# Altium PCB Aquarium_ATO_V1_0_LCEDA.PcbDoc
Units mm, origin at the board's own origin, x right, y up, seen from the top; angles counter-clockwise.
Board outline 120 x 72 mm, 2 copper layers (Top Layer, Bottom Layer), stack 1.58 mm thick; 64 components, 41 nets, 182 pads, 109 vias.
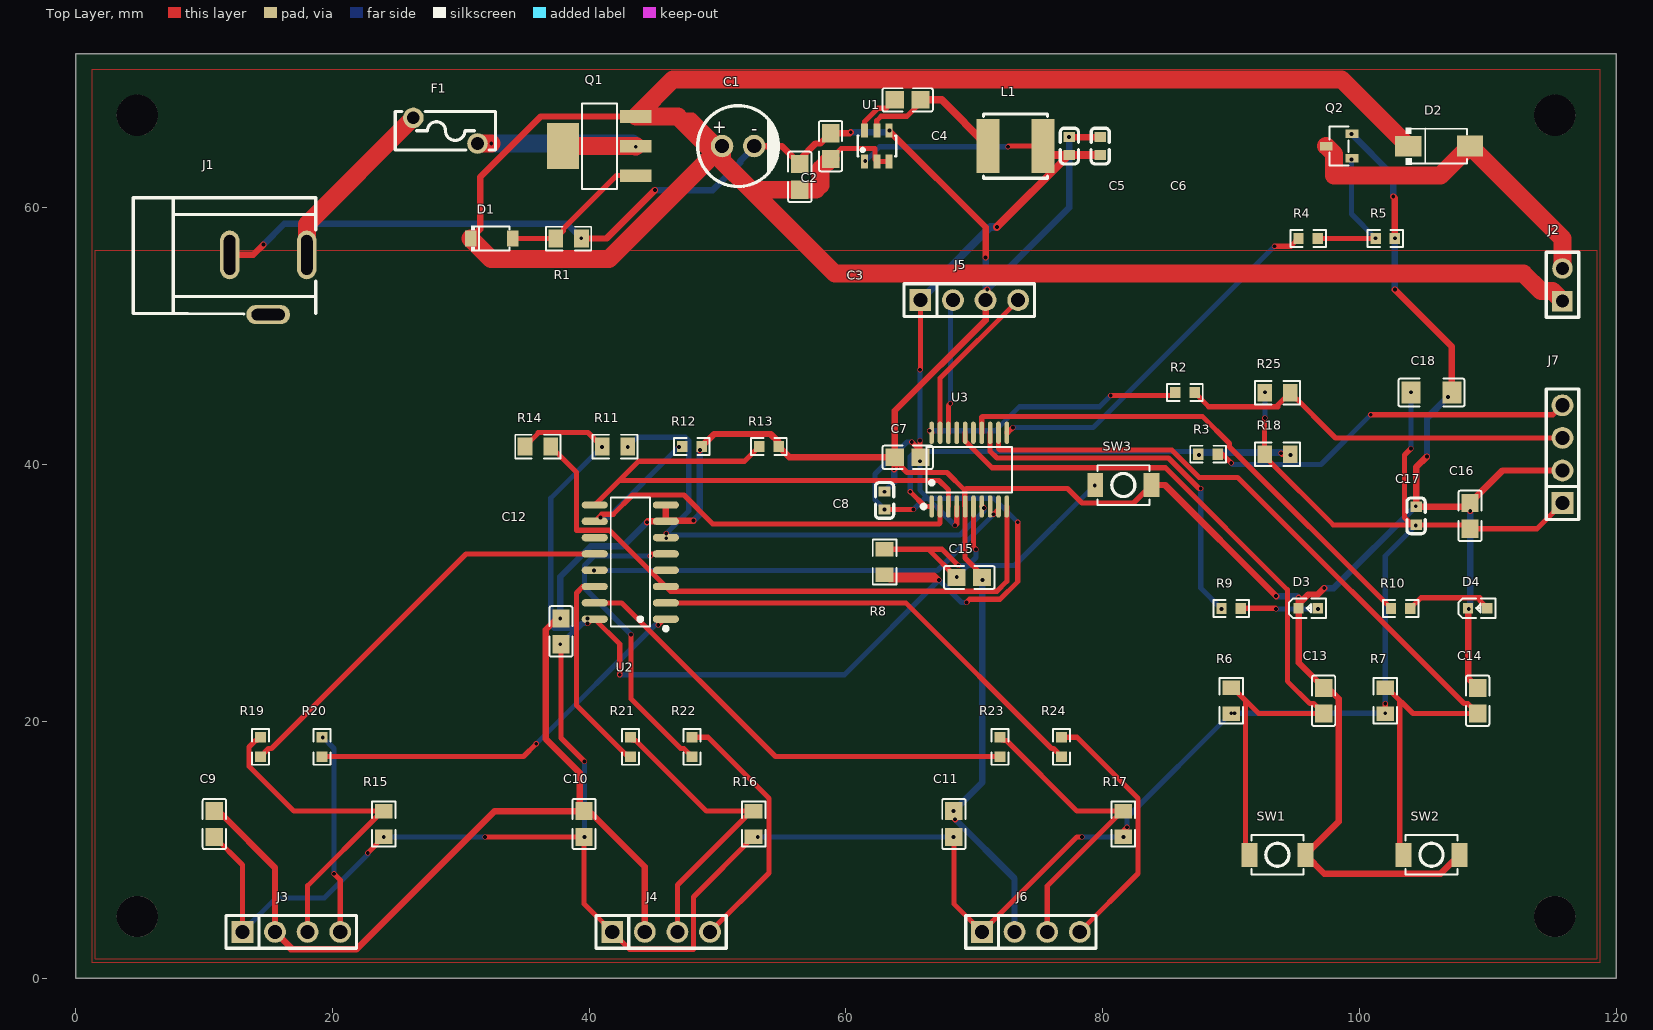
[diagram p0: Top Layer view]
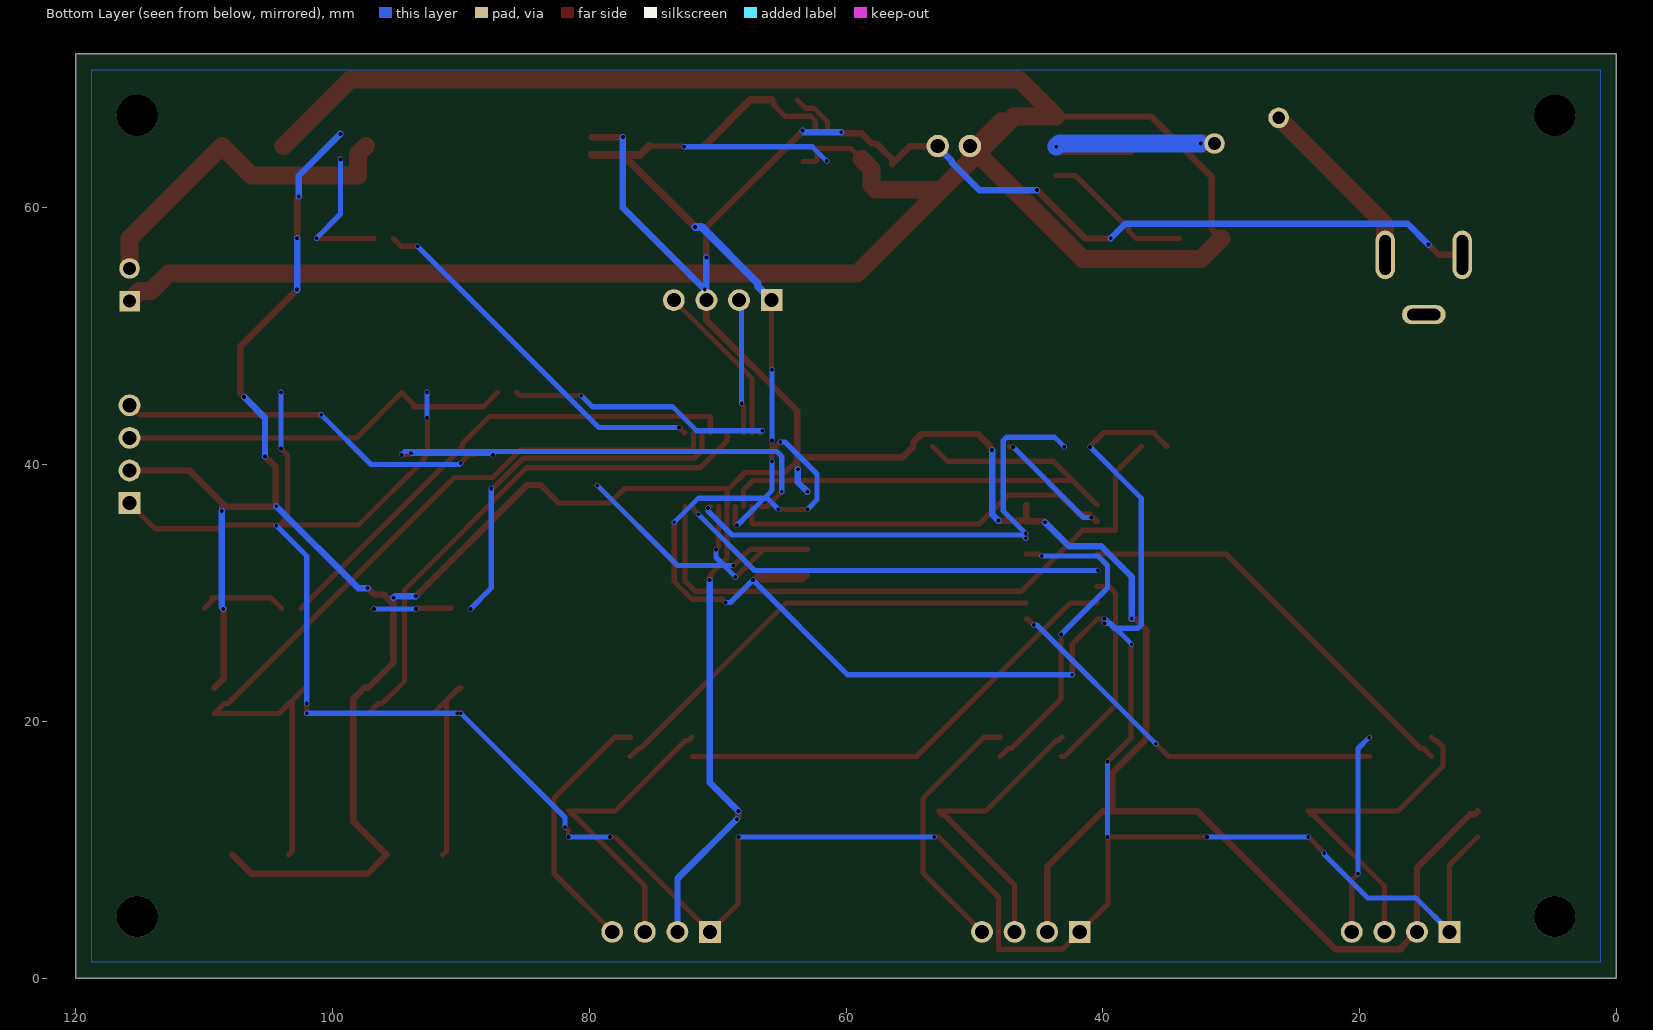
[diagram p1: Bottom Layer view, seen from below]

## Layer stack, top to bottom
Top Solder Mask Layer: solder mask 0.0102, Dk 3.3
Top Layer: signal copper 0.0356
Dielectric1: surface 1.5088, FR4, Dk 4.5
Bottom Layer: signal copper 0.0356
Bottom Solder Mask Layer: solder mask 0.0102, Dk 3.3

## Board outline
0,0 120,0 120,72 0,72

## Components (designator, comment, footprint, x,y, rotation, side; value= is the part's Value field where it differs from the comment)
C1 "47uF" CAP-TH_BD6.3-P2.50-D0.6-FD 51.6,64.8 r0 top
C2 "10uF" C0805#1 56.4,62.4 r90 top
C3 "100nF" C0805#1 58.8,64.8 r90 top
C4 "100nF" C0805#2 64.8,68.4 r0 top
C5 "22uF" C0603#1 77.4,64.8 r90 top
C6 "22uF" C0603#1 79.8,64.8 r90 top
C7 "100nF" C0805#2 64.8,40.56 r180 top
C8 "4.7uF" C0603#2 63,37.2 r90 top
C9 "100nF" C0805#2 10.8,12 r90 top
C10 "100nF" C0805#3 39.6,12 r90 top
C11 "100nF" C0805#2 68.4,12 r90 top
C12 "100nF" C0805#2 37.8,27 r90 top
C13 "100nF" C0805#2 97.2,21.6 r90 top
C14 "100nF" C0805#2 109.2,21.6 r90 top
C15 "100nF" C0805#3 69.6,31.2 r0 top
C16 "100nF" C0805#2 108.6,36 r90 top
C17 "10uF" C0603#2 104.4,36 r90 top
C18 "220uF" C1206 105.6,45.6 r0 top
D1 "BZT52C10" SOD-123_L2.7-W1.6-LS3.7-RD 32.4,57.6 r0 top
D2 "SS16" SMA_L4.3-W2.6-LS5.0-RD 106.2,64.8 r0 top
D3 "FC-1608G1-520" LED0603-RD 96,28.8 r0 top
D4 "XL-1608SURC-06" LED0603-RD_RED 109.2,28.8 r0 top
F1 "RL60-050" FUSE-TH_L7.8-W3.0-P5.10-D0.5-S2.00 28.8,66 r0 top
J1 "DC005-T25" DC-IN-TH_DC-005-20A-1 15,54 r0 top
J2 "LAIL-PZ2.54-2P-L" CONN-TH_LAIL-PZ2.54-2P-L 115.8,54 r90 top
J3 "HX PZ2.54-1x4P ZZ" HDR-TH_4P-P2.54-V-M 16.8,3.6 r0 top
J4 "HX PZ2.54-1x4P ZZ" HDR-TH_4P-P2.54-V-M 45.6,3.6 r0 top
J5 "HX PZ2.54-1x4P ZZ" HDR-TH_4P-P2.54-V-M 69.6,52.8 r0 top
J6 "HX PZ2.54-1x4P ZZ" HDR-TH_4P-P2.54-V-M 74.4,3.6 r0 top
J7 "HX PZ2.54-1x4P ZZ" HDR-TH_4P-P2.54-V-M 115.8,40.8 r90 top
L1 "3.9uH" IND-SMD_L5.0-W5.0_FNR50XXS 73.2,64.8 r0 top
Q1 "DMP6023LE-13" SOT-223-4_L6.5-W3.5-P2.30-LS7.0-BR 40.8,64.8 r0 top
Q2 "AO3400A" SOT-23-3_L2.9-W1.3-P1.90-LS2.4-BR 98.4,64.8 r0 top
R1 "47kΩ" R0805 38.4,57.6 r0 top
R2 "1kΩ" R0603#1 86.4,45.6 r0 top
R3 "1kΩ" R0603#2 88.2,40.8 r0 top
R4 "1kΩ" R0603#1 96,57.6 r0 top
R5 "100kΩ" R0603#2 102,57.6 r0 top
R6 "10kΩ" R0805 90,21.6 r90 top
R7 "10kΩ" R0805 102,21.6 r90 top
R8 "10kΩ" R0805 63,32.4 r90 top
R9 "1kΩ" R0603#2 90,28.8 r0 top
R10 "1kΩ" R0603#1 103.2,28.8 r0 top
R11 "10kΩ" R0805 42,41.4 r0 top
R12 "100kΩ" R0603#2 48,41.4 r0 top
R13 "100kΩ" R0603#1 54,41.4 r0 top
R14 "10kΩ" R0805 36,41.4 r0 top
R15 "10kΩ" R0805 24,12 r90 top
R16 "10kΩ" R0805 52.8,12 r90 top
R17 "10kΩ" R0805 81.6,12 r90 top
R18 "10kΩ" R0805 93.6,40.8 r0 top
R19 "1kΩ" R0603#1 14.4,18 r90 top
R20 "1kΩ" R0603#3 19.2,18 r90 top
R21 "1kΩ" R0603#1 43.2,18 r90 top
R22 "1kΩ" R0603#1 48,18 r90 top
R23 "1kΩ" R0603#3 72,18 r90 top
R24 "1kΩ" R0603#1 76.8,18 r90 top
R25 "10kΩ" R0805 93.6,45.6 r0 top
SW1 "TS-1088-AR02016" SW-SMD_L3.9-W3.0-P4.45 93.6,9.6 r0 top
SW2 "TS-1088-AR02016" SW-SMD_L3.9-W3.0-P4.45 105.6,9.6 r0 top
SW3 "TS-1088-AR02016" SW-SMD_L3.9-W3.0-P4.45 81.6,38.4 r0 top
U1 "AP63203WU-7" TSOT-26_L2.9-W1.6-P0.95-LS2.8-BL 62.4,64.8 r0 top
U2 "74HC4052D,652" SO-16_L9.9-W3.9-P1.27-LS6.0-BL 43.2,32.4 r90 top
U3 "STM32G030F6P6" TSSOP-20_L6.5-W4.4-P0.65-LS6.4-BL 69.6,39.6 r0 top

## Footprints (in the part's own frame and the unit in brackets; to place one, negate y for a bottom-side part, rotate by r counter-clockwise, add the part's x,y. Pads: shape width x height; smd on the part's side, far side on the other; paste and mask are expansions set on the pad)
C0603#1 [mil]
  rect 31.5x35.4 smd: 1(-27.6,0) 2(27.6,0)
  silkscreen extent -55,-28 55,28
C0603#2 [mil]
  rect 31.5x35.4 smd: 1(-27.5,0) 2(27.6,0)
  silkscreen extent -55,-28 55,28
C0805#1 [mil]
  rect 55.5x53.1 smd paste-3937 mask+2: 1(-39.4,0) 2(39.3,0)
  silkscreen extent -77,-36 77,36
C0805#2 [mil]
  rect 55.5x53.1 smd paste-3937 mask+2: 1(-39.4,0) 2(39.4,0)
  silkscreen extent -77,-36 77,36
C0805#3 [mil]
  rect 55.5x53.1 smd paste-3937 mask+2: 1(-39.3,0) 2(39.4,0)
  silkscreen extent -77,-36 77,36
C1206 [mil]
  rect 58.5x68 smd paste-3937 mask+2: 1(-62.7,0) 2(62.7,0)
  silkscreen extent -101,-43 101,43
CAP-TH_BD6.3-P2.50-D0.6-FD [mm]
  round 1.75 hole 1.1 paste+0 mask+0.051: 1(-1.25,0) 2(1.25,0)
  silkscreen extent -3.15,-3.15 3.21,3.15
CONN-TH_LAIL-PZ2.54-2P-L [mil]
  rect 63x63 hole 39.4 paste+0 mask+2: 1(-50,0)
  round 63 hole 39.4 paste+0 mask+2: 2(50,0)
  silkscreen extent -100,-50 100,50
DC-IN-TH_DC-005-20A-1 [mil]
  oval 59.1x149.6 hole 35.4 slot 122.1 at 90 deg: 1(118.2,91.5) 2(-118.1,91.5)
  oval 133.9x59.1 hole 35.4 slot 102.4 at 0 deg: 3(0,-91.5)
  silkscreen extent -414,-90 146,267
FUSE-TH_L7.8-W3.0-P5.10-D0.5-S2.00 [mil]
  round 63 hole 39.4: 1(-98.4,39.4) 2(98.4,-39.4)
  silkscreen extent -154,-59 154,59
HDR-TH_4P-P2.54-V-M [mm]
  rect 1.699x1.699 hole 1.1: 1(-3.81,0)
  round 1.699 hole 1.1: 2(-1.27,0) 3(1.27,0) 4(3.81,0)
  silkscreen extent -5.08,-1.27 5.08,1.27
IND-SMD_L5.0-W5.0_FNR50XXS [mm]
  rect 1.801x4.201 smd: 1(-2.149,0) 2(2.149,0)
  silkscreen extent -2.5,-2.5 2.5,2.5
LED0603-RD [mil]
  rect 31.5x31.5 smd: 1(-29.5,0) 2(29.5,0)
  silkscreen extent -59,-29 55,30
LED0603-RD_RED [mil]
  rect 31.5x31.5 smd: 1(-29.5,-0.1) 2(29.5,0.2)
  silkscreen extent -59,-29 55,30
R0603#1 [mil]
  rect 31.8x34 smd paste-3937 mask+2: 1(-29.7,0) 2(29.7,0)
  silkscreen extent -54,-26 54,26
R0603#2 [mil]
  rect 31.8x34 smd paste-3937 mask+2: 1(-29.7,0) 2(29.6,0)
  silkscreen extent -55,-26 54,26
R0603#3 [mil]
  rect 31.8x34 smd paste-3937 mask+2: 1(-29.6,0) 2(29.7,0)
  silkscreen extent -54,-26 54,26
R0805 [mm]
  rect 1.133x1.377 smd paste-100 mask+0.051: 1(-1.001,0) 2(1.001,0)
  silkscreen extent -1.76,-0.92 1.76,0.92
SMA_L4.3-W2.6-LS5.0-RD [mm]
  rect 2.047x1.621 smd: 1(-2.403,-0.01) 2(2.403,0.01)
  silkscreen extent -2.61,-1.44 2.16,1.44
SO-16_L9.9-W3.9-P1.27-LS6.0-BL [mil]
  oval 22.6x80.2 smd: 1(-175,-109) 2(-125,-109) 3(-75,-109) 4(-25,-109) 5(25,-109) 6(75,-109) 7(125,-109) 8(175,-109) 9(175,109) 10(125,109) 11(75,109) 12(25,109) 13(-25,109) 14(-75,109) 15(-125,109) 16(-175,109)
  silkscreen extent -210,-115 198,60
SOD-123_L2.7-W1.6-LS3.7-RD [mil]
  rect 35.8x48 smd: 1(-64.4,0) 2(64.4,0)
  silkscreen extent -63,-40 54,40
SOT-23-3_L2.9-W1.3-P1.90-LS2.4-BR [mm]
  rect 1.001x0.65 smd: 1(1.001,-0.95) 2(1.001,0.95) 3(-1.001,0)
  silkscreen extent -0.73,-1.53 0.73,1.53
SOT-223-4_L6.5-W3.5-P2.30-LS7.0-BR [mm]
  rect 2.469x0.98 smd: 1(2.835,-2.301) 2(2.835,0) 3(2.835,2.301)
  rect 2.469x3.599 smd: 4(-2.835,0)
  silkscreen extent -1.37,-3.33 1.37,3.33
SW-SMD_L3.9-W3.0-P4.45 [mil]
  rect 48.4x73.2 smd: 1(-86,0) 2(86,0)
  silkscreen extent -80,-61 80,61
TSOT-26_L2.9-W1.6-P0.95-LS2.8-BL [mm]
  rect 0.551x1.1 smd paste+0 mask+0.051: 1(-0.95,-1.199) 2(0,-1.199) 3(0.95,-1.199) 4(0.95,1.199) 5(0,1.199) 6(-0.95,1.199)
  silkscreen extent -1.5,-0.8 1.5,0.8
TSSOP-20_L6.5-W4.4-P0.65-LS6.4-BL [mil]
  oval 14.3x68.6 smd: 1(-115.2,-113) 2(-89.6,-113) 3(-64,-113) 4(-38.4,-113) 5(-12.8,-113) 6(12.8,-113) 7(38.4,-113) 8(64,-113) 9(89.6,-113) 10(115.2,-113) 11(115.2,113) 12(89.6,113) 13(64,113) 14(38.4,113) 15(12.8,113) 16(-12.8,113) 17(-38.4,113) 18(-64,113) 19(-89.6,113) 20(-115.2,113)
  silkscreen extent -146,-119 131,70

## Free pads (board coordinates)
  round 3.2 hole 3.2 unplated paste+0 mask+0: MH1(4.8,67.2) MH2(115.2,67.2) MH3(4.8,4.8) MH4(115.2,4.8)

## Via types
v1: diameter 0, hole 0.3, Top Layer to Bottom Layer, 109 vias

## Nets (pads, with @x,y where several pads share a name; then routed paths per layer and width w, separated by ;. In a path a pad name is that pad's centre, name@x,y a point inside that pad or via, vN(x,y) a via of type N, cw(c..) or ccw(c..) an arc to the next point about the centre after c; other vN are vias at no path point)
+3V3: C5.1 C6.1 C7.1 C8.1 C9.1 C10.1 C11.1 C12.1 C16.1 C17.1 C18.1 J3.1 J4.1 J5.1 J6.1 J7.1 L1.2 R6.1 R7.1 R8.1 R11.1 R14.1 R15.1 R16.1 R17.1 R18.1 R25.1 U1.1 U2.16 U3.4 | length 361
  Top Layer w0.4: C9.1 12.99,8.809 J3.1 v1(13,3.625) ; v1(22.75,9.75) R15.1 ; v1(31.875,11) C10.1 ; R14.1 36,42.401 36,42.5 39.899,42.5 R11.1 v1(41,41.375) ; v1(37.75,26) C12.1 37.8,18.7 v1(39.625,16.875) ; v1(39.625,11) C10.1 ; v1(39.875,27.625) 40.205,27.955 U2.16 ; v1(39.875,28) 39.92,27.955 U2.16 ; v1(42.375,23.625) 42.375,26.011 U2.16 ; v1(53.125,11) R16.1 48.125,6.324 48.125,2.25 43.14,2.25 J4.1 39.6,5.79 C10.1 ; U1.1 61.474,63.625 v1(61.5,63.625) ; v1(63,36.5) C8.1 v1(65.25,36.5) ; v1(65.125,41.75) 65.801,41.074 C7.1 ; v1(65.75,40.25) 65.801,40.301 C7.1 ; v1(65.75,41.875) 65.75,40.611 C7.1 ; v1(65.75,47.375) 65.79,47.415 J5.1 ; v1(68.375,11) C11.1 68.4,5.79 J6.1 77.99,11 v1(78.375,11) ; v1(68.5,35.25) 68.625,35.375 U3.4 ; v1(69.375,29.25) 69.625,29.5 72,29.5 73.375,30.875 v1(73.375,35.5) ; v1(72.625,64.75) 72.675,64.8 L1.2 ; v1(81.625,11) R17.1 81.6,11.475 v1(81.875,11.75) ; v1(90,20.625) R6.1 90.224,20.599 v1(90.25,20.625) ; R25.1 v1(92.625,45.625) ; v1(92.625,43.625) 92.599,43.599 R18.1 92.875,40.524 92.875,40.375 97.949,35.301 C17.1 ; v1(102,20.625) R7.1 v1(102,21.375) ; v1(104,41.25) 103.5,40.75 103.5,35.875 104.074,35.301 C17.1 ; v1(104,45.625) C18.1 ; v1(104.375,35.25) 104.375,35.276 C17.1 ; J7.1 113.809,34.999 C16.1 108.298,35.301 C17.1 ; R8.1 66.851,31.399 v1(67.25,31) 63.399,31 R8.1
  Top Layer w0.6: v1(65.75,52.75) J5.1 ; v1(71.75,58.5) 77.349,64.099 C5.1 ; L1.2 76.05,64.099 C5.1 ; C6.1 C5.1
  Bottom Layer w0.4: v1(13,3.625) 15.625,6.25 19.375,6.25 22.75,9.625 v1(22.75,9.75) ; v1(24,11) v1(31.875,11) ; v1(37.75,26) 39.375,27.625 v1(39.875,27.625) ; v1(39.625,11) v1(39.625,16.875) ; v1(39.875,28) 39.125,27.25 37.25,27.25 37,27.5 37,37.375 v1(41,41.375) ; v1(42.375,23.625) 59.875,23.625 v1(67.25,31) 69,29.25 v1(69.375,29.25) ; v1(53.125,11) v1(68.375,11) ; v1(61.5,63.625) 62.625,64.75 v1(72.625,64.75) ; v1(63,36.5) 62.25,37.25 62.25,39.25 64.75,41.75 v1(65.125,41.75) ; v1(65.25,36.5) 66.125,37.375 71.5,37.375 v1(73.375,35.5) ; v1(65.75,40.25) 65.75,38 v1(68.5,35.25) ; v1(65.75,41.875) v1(65.75,47.375) ; v1(78.375,11) v1(81.625,11) ; v1(81.875,11.75) 81.875,12.5 v1(90,20.625) ; v1(90.25,20.625) v1(102,20.625) ; v1(92.625,43.625) v1(92.625,45.625) ; v1(102,21.375) 102,32.875 v1(104.375,35.25) ; v1(104,41.25) v1(104,45.625)
  Bottom Layer w0.6: v1(65.75,52.75) 66.875,53.875 66.875,54.125 71.25,58.5 v1(71.75,58.5)
+12V_IN: F1.1 J1.1 | length 14.1
  Top Layer w1.4: J1.1 18.002,58.702 F1.1
AUX_RX: J4.3 R16.2 R21.2 | length 23.9
  Top Layer w0.4: R21.2 43.454,18.5 43.625,18.5 49.124,13.001 R16.2 52.549,12.75 52.375,12.75 46.87,7.245 J4.3
AUX_RX_MUX: R21.1 U2.14 | length 16.2
  Top Layer w0.4: U2.14 39.495,30.495 39,30 39,21.25 43,17.25 R21.1
AUX_TX: J4.4 R22.2 | length 20.3
  Top Layer w0.4: R22.2 49.246,18.754 54,14 54,8.19 J4.4
AUX_TX_MUX: R22.1 U2.5 | length 25.2
  Top Layer w0.4: v1(43.25,26.75) 43.25,21.75 47.125,17.875 47.371,17.875 R22.1 ; v1(44.75,32.875) 44.91,33.035 U2.5
  Bottom Layer w0.4: v1(43.25,26.75) 39.625,30.375 39.625,32.125 40.375,32.875 v1(44.75,32.875)
BST: C4.1 U1.6 | length 3.8
  Top Layer w0.4: U1.6 61.45,66.7 62.5,67.75 63.149,67.75 C4.1
D3_A: D3.2 R9.2 | length 6.1
  Top Layer w0.4: R9.2 93.45,28.8 v1(93.5,28.75) ; v1(96.75,28.75) D3.2
  Bottom Layer w0.4: v1(93.5,28.75) v1(96.75,28.75)
D4_A: D4.2 R10.2 | length 6.8
  Top Layer w0.4: R10.2 104.779,29.625 109.375,29.625 109.375,29.379 D4.2
GND: C1.2 C2.2 C3.2 C5.2 C6.2 C7.2 C8.2 C9.2 C10.2 C11.2 C12.2 C13.2 C14.2 C15.2 C16.2 C17.2 C18.2 D3.1 D4.1 J1.2 J3.2 J4.2 J5.3 J6.2 J7.2 Q2.2 R1.2 R5.2 R12.2 R13.2 SW1.2 SW2.2 SW3.2 U1.4 U2.7 U2.8 U3.5 | length 404.7
  Top Layer w0.4: C7.2 63.799,40.326 64.75,39.375 67.875,39.375 69.25,38 69.25,36.755 U3.5 ; C15.2 70.5,31.301 70.5,31.5 69.275,32.725 U3.5 ; SW3.2 82.384,37 78.375,37 77.25,38.125 69.375,38.125 69.275,38.025 U3.5
  Top Layer w0.5: C9.2 11.051,12.75 11.375,12.75 15.53,8.595 J3.2 16.75,2.38 16.75,2.25 21.875,2.25 32.626,13.001 C10.2 ; J1.2 13.824,56.324 v1(14.625,57.125) ; v1(37.75,28) C12.2 37.501,28.001 36.625,27.125 36.625,18.625 39.25,16 39.25,13.351 C10.2 ; v1(39.375,57.625) R1.2 41.35,57.6 v1(45.125,61.375) ; J4.2 44.33,8.67 39.999,13.001 C10.2 ; v1(44.5,35.5) 44.575,35.575 U2.7 ; U2.8 U2.7 ; v1(48.125,35.625) 46.019,35.625 U2.7 ; v1(48.625,41.125) 48.752,41.252 R12.2 49.727,42.375 54.125,42.375 54.754,41.746 R13.2 55.594,40.56 C7.2 ; v1(52.875,64.75) 52.875,64.775 C1.2 54.998,64.8 C2.2 56.4,63.775 57.625,65 58.002,65 C3.2 60.298,65.798 v1(60.375,65.875) ; v1(63,37.875) C8.2 ; v1(63.375,66) U1.4 70.875,58.474 v1(70.875,56.125) ; v1(63.75,39.625) 63.799,39.674 C7.2 ; v1(68.375,13) C11.2 68.4,12.475 v1(68.5,12.375) ; C15.2 70.601,31.024 v1(70.625,31) ; v1(70.875,52.75) J5.3 ; v1(71,53.625) 70.87,53.495 J5.3 ; v1(73.125,3.625) J6.2 ; v1(77.375,65.5) C5.2 C6.2 ; SW3.2 84.85,38.4 v1(93.5,29.75) ; v1(95.25,29.625) D3.1 ; v1(97.25,30.375) 96.75,29.875 96,29.875 95.251,29.126 D3.1 ; v1(99.375,65.75) Q2.2 ; v1(102.625,60.875) 102.752,60.748 R5.2 v1(102.75,57.625) ; v1(102.75,53.625) 107.193,49.182 C18.2 106.875,45.282 v1(106.875,45.25) ; v1(104.375,36.75) 104.375,36.726 C17.2 ; v1(105.25,40.625) 104.4,39.775 C17.2 ; SW2.2 106.309,8.125 97.259,8.125 SW1.2 98.375,12.191 98.375,21.75 97.524,22.601 C13.2 95.251,24.55 D3.1 ; v1(108.5,28.75) D4.1 108.451,23.35 C14.2 ; v1(108.625,36.375) 108.6,36.4 C16.2 ; J7.2 111.129,39.53 C16.2 ; C7.2 63.799,44.174 70.87,51.245 J5.3 ; C17.2 108.3,36.701 C16.2
  Bottom Layer w0.5: v1(14.625,57.125) 16.25,58.75 38.25,58.75 v1(39.375,57.625) ; v1(37.75,28) 37.75,31.25 40.125,33.625 42.625,33.625 v1(44.5,35.5) ; v1(45.125,61.375) 49.625,61.375 51.75,63.5 51.75,63.625 v1(52.875,64.75) ; v1(48.125,35.625) 48.625,36.125 v1(48.625,41.125) ; v1(60.375,65.875) 63.25,65.875 v1(63.375,66) ; v1(63,37.875) 63.75,38.625 v1(63.75,39.625) ; v1(68.375,13) 70.625,15.25 v1(70.625,31) ; v1(68.5,12.375) 73.125,7.75 v1(73.125,3.625) ; v1(70.875,52.75) v1(70.875,56.125) ; v1(71,53.625) 77.375,60 v1(77.375,65.5) ; v1(93.5,29.75) 95.125,29.75 v1(95.25,29.625) ; v1(97.25,30.375) 98,30.375 v1(104.375,36.75) ; v1(99.375,65.75) 102.625,62.5 v1(102.625,60.875) ; v1(102.75,53.625) v1(102.75,57.625) ; v1(105.25,40.625) 105.25,43.625 v1(106.875,45.25) ; v1(108.5,28.75) 108.625,28.875 v1(108.625,36.375)
KEY_AUTO: C13.1 R6.2 SW1.1 U3.16 | length 63.2
  Top Layer w0.4: U3.16 69.275,41.85 71.375,39.75 84.875,39.75 94.375,30.25 94.375,23.125 96.125,21.375 96.424,21.375 C13.1 92.151,20.599 90.25,22.5 90.101,22.5 R6.2 90.149,22.601 91.125,21.625 91.125,9.891 SW1.1
KEY_MANUAL: C14.1 R7.2 SW2.1 U3.12 | length 68.8
  Top Layer w0.4: U3.12 71.876,41.249 72,41.125 85.375,41.125 87.5,39 90.5,39 108.125,21.375 108.424,21.375 C14.1 104.151,20.599 102.25,22.5 102.101,22.5 R7.2 102.149,22.601 103.125,21.625 103.125,9.891 SW2.1
LED_FAULT: R10.1 U3.14 | length 39.5
  Top Layer w0.4: U3.14 70.575,43.7 70.625,43.75 87.75,43.75 89.875,41.625 89.875,41.371 R10.1
LED_STATUS: R9.1 U3.13 | length 29.1
  Top Layer w0.4: U3.13 71.226,41.024 71.75,40.5 85.125,40.5 87.5,38.125 v1(87.625,38.125) ; R9.1 v1(89.25,28.75)
  Bottom Layer w0.4: v1(87.625,38.125) 87.625,30.375 v1(89.25,28.75)
MAIN_RX: J3.3 R15.2 R19.2 | length 26.6
  Top Layer w0.4: R19.2 14.146,18.5 14,18.5 13.5,18 13.5,16.5 16.999,13.001 R15.2 23.749,12.75 23.625,12.75 18.07,7.195 J3.3
MAIN_RX_MUX: R19.1 U2.12 | length 32.6
  Top Layer w0.4: R19.1 15.029,17.875 15.25,17.875 30.41,33.035 U2.12
MAIN_TX: J3.4 R20.2 | length 15.8
  Top Layer w0.4: R20.2 v1(19.25,18.75) ; v1(20.125,8.125) 20.61,7.64 J3.4
  Bottom Layer w0.4: v1(19.25,18.75) 20.125,17.875 v1(20.125,8.125)
MAIN_TX_MUX: R20.1 U2.1 | length 31.2
  Top Layer w0.4: R20.1 34.873,17.248 v1(35.875,18.25) ; v1(45.375,27.5) 45.83,27.955 U2.1
  Bottom Layer w0.4: v1(35.875,18.25) 45.125,27.5 v1(45.375,27.5)
MUX_E: R11.2 U2.6 U3.7 | length 39.7
  Top Layer w0.4: v1(43,41.375) R11.2 ; v1(46,34.25) 46,34.274 U2.6 45.969,34.594 v1(46,34.625) ; U3.7 70.645,36.73 v1(70.75,36.625)
  Bottom Layer w0.4: v1(43,41.375) 43.75,42.125 47.5,42.125 47.75,41.875 47.75,36.375 v1(46,34.625) ; v1(46,34.25) 46.25,34.5 68.875,34.5 70.75,36.375 v1(70.75,36.625)
MUX_S0: R12.1 U2.10 U3.2 | length 39.2
  Top Layer w0.4: v1(40.875,35.875) 40.575,35.575 U2.10 40.981,36.125 41.875,36.125 43.375,37.625 47.375,37.625 49.625,35.375 67.25,35.375 67.324,35.449 U3.2 ; v1(47,41.375) 47.221,41.375 R12.1
  Bottom Layer w0.4: v1(40.875,35.875) 41.5,35.875 v1(47,41.375)
MUX_S1: R13.1 U2.9 U3.3 | length 44.6
  Top Layer w0.4: R13.1 52.096,40.25 43.836,40.25 U2.9 42.336,38.75 67.25,38.75 67.974,38.026 U3.3
NRST: C15.1 R8.2 SW3.1 U3.6 | length 32.3
  Top Layer w0.4: v1(68.625,31.25) 68.625,31.223 C15.1 66.401,33.401 R8.2 67.474,33.401 v1(68.75,32.125) ; U3.6 69.925,33.575 v1(70.125,33.375) ; v1(79.375,38.375) 79.391,38.375 SW3.1
  Bottom Layer w0.4: v1(68.625,31.25) 70.125,32.75 v1(70.125,33.375) ; v1(68.75,32.125) 73.125,32.125 v1(79.375,38.375)
PUMP_CMD: R4.1 U3.11 | length 29
  Top Layer w0.4: U3.11 72.595,42.47 v1(73,42.875) ; v1(93.375,57) 94.646,57 R4.1
  Bottom Layer w0.4: v1(73,42.875) 79.25,42.875 v1(93.375,57)
PUMP_GATE: Q2.1 R4.2 R5.1 | length 11.5
  Top Layer w0.4: R4.2 R5.1 v1(101.25,57.625) ; v1(99.375,63.75) 99.401,63.776 Q2.1
  Bottom Layer w0.4: v1(99.375,63.75) 99.375,59.5 v1(101.25,57.625)
PUMP_NEG: D2.2 J2.2 Q2.3 | length 26.6
  Top Layer w1.4: Q2.3 98,64.199 98,62.5 106.293,62.5 D2.2 115.8,57.613 J2.2
Q1_GATE: D1.2 Q1.1 R1.1 | length 11.7
  Top Layer w0.4: D1.2 R1.1 38,58.201 38,58.375 42.124,62.499 Q1.1
RES_RX: J6.3 R17.2 R23.2 | length 23.9
  Top Layer w0.4: R23.2 72.254,18.5 72.5,18.5 77.999,13.001 R17.2 81.349,12.75 81.25,12.75 75.67,7.17 J6.3
RES_RX_MUX: R23.1 U2.15 | length 36.5
  Top Layer w0.4: U2.15 42.525,29.225 54.502,17.248 R23.1
RES_TX: J6.4 R24.2 | length 20.2
  Top Layer w0.4: R24.2 77.996,18.754 82.75,14 82.75,8.14 J6.4
RES_TX_MUX: R24.1 U2.2 | length 35.8
  Top Layer w0.4: U2.2 64.65,29.225 76,17.875 76.171,17.875 R24.1
SENS_RX: R14.2 U2.3 U3.10 | length 49
  Top Layer w0.4: R14.2 39,39.401 39,34.875 41.589,34.875 U2.3 46.339,30.125 71.75,30.125 72.526,30.901 U3.10
SENS_TX: U2.13 U3.9 | length 33.8
  Top Layer w0.4: v1(40.375,31.75) 40.416,31.75 U2.13 ; v1(71.5,36.125) 71.876,36.501 U3.9
  Bottom Layer w0.4: v1(40.375,31.75) 67.125,31.75 v1(71.5,36.125)
SW: C4.2 L1.1 U1.5 | length 11.7
  Top Layer w0.4: U1.5 62.4,66.775 62.75,67.125 64.75,67.125 65.625,68 65.625,68.224 C4.2
  Top Layer w0.6: C4.2 67.451,68.4 L1.1
SWCLK: J5.4 U3.19 | length 12.9
  Top Layer w0.4: U3.19 67.324,46.714 J5.4
SWDIO: J5.2 U3.18 | length 10.5
  Top Layer w0.4: U3.18 67.974,44.599 v1(68.125,44.75) ; J5.2 v1(68.375,52.75)
  Bottom Layer w0.4: v1(68.125,44.75) 68.125,52.5 v1(68.375,52.75)
VIN_FUSED: F1.2 Q1.2 Q1.4 | length 18.1
  Top Layer w1.4: F1.2 v1(32.375,65) ; Q1.4 Q1.2 v1(43.625,64.75)
  Bottom Layer w1.4: v1(32.375,65) 43.375,65 v1(43.625,64.75)
VIN_P: C1.1 C2.1 C3.1 D1.1 D2.1 J2.1 Q1.3 U1.2 U1.3 | length 210.5
  Top Layer w0.4: C3.1 59.626,64.625 62.25,64.625 62.25,63.751 U1.2 U1.3
  Top Layer w0.5: D1.1 31.5,58.336 31.5,62.375 36.226,67.101 Q1.3
  Top Layer w0.65: Q1.3 48.049,67.101 C1.1
  Top Layer w1.4: D1.1 32.364,56 41.55,56 C1.1 50.35,63.65 52.601,61.399 C2.1 57.649,61.399 58,61.75 58,62.999 C3.1 ; D2.1 98.587,70 46.533,70 Q1.3 46.899,67.101 59.125,54.875 112.75,54.875 114.125,53.5 115.03,53.5 J2.1
WIFI_MODULE_RX: J7.3 R2.2 R25.2 | length 31.1
  Top Layer w0.4: R2.2 88.254,44.5 93.625,44.5 93.625,44.624 R25.2 98.131,42.07 J7.3
WIFI_MODULE_TX: J7.4 R3.2 | length 29.1
  Top Layer w0.4: R3.2 89.325,40.8 v1(90,40.125) ; v1(100.875,43.875) 115.065,43.875 J7.4
  Bottom Layer w0.4: v1(90,40.125) 90.125,40 97,40 v1(100.875,43.875)
WIFI_RX: R3.1 R18.2 U3.1 | length 42.1
  Top Layer w0.4: v1(65,37.875) 66.145,36.73 U3.1 ; R3.1 v1(87.5,40.75) ; v1(93.875,40.875) 93.95,40.8 R18.2 94.625,40.776 v1(94.625,40.75)
  Bottom Layer w0.4: v1(65,37.875) 65,40.625 65.375,41 94.375,41 v1(94.625,40.75) ; v1(87.5,40.75) 87.625,40.875 v1(93.875,40.875)
WIFI_TX: R2.1 U3.20 | length 20.6
  Top Layer w0.4: v1(66.5,42.625) 66.655,42.47 U3.20 ; v1(80.625,45.375) 85.421,45.375 R2.1
  Bottom Layer w0.4: v1(66.5,42.625) 71.625,42.625 73.5,44.5 79.75,44.5 v1(80.625,45.375)
pads on no net: J1.3 U2.4 U2.11 U3.8 U3.15 U3.17

## Polygon pours and split planes (outlines as drawn)
GND on Top Layer (solid, remove dead copper): 1.25,1.25 118.75,1.25 118.75,70.75 1.25,70.75
GND on Bottom Layer (solid, remove dead copper): 1.25,1.25 118.75,1.25 118.75,70.75 1.25,70.75
+3V3 on Top Layer (solid, remove dead copper): 1.5,1.5 118.5,1.5 118.5,56.64 1.5,56.64

## Silkscreen, mask and mechanical layers (free items; w line width, h text height)
Mechanical Layer:
  the board outline again, w0.2
Inner31:
  text "AQUARIUM ATO V1.0" at 2.4,69.6 h1
  text "POWER / BUCK" at 21.6,69.6 h0.8
  text "PUMP" at 98.4,69.6 h0.8
  text "MCU / SWD" at 61.2,51.6 h0.8
  text "WIFI / USER" at 92.4,33.6 h0.8
  text "SENSORS" at 2.4,24 h0.8
  text "ROUTED - IMPORT / DRC REQUIRED" at 82.8,2.4 h0.7

## Text inside footprints (layer, text, board x,y; h text height)
C1: Top Silkscreen Layer "+" at 49.568,65.816 h1; Top Silkscreen Layer "-" at 52.616,65.689 h1